# Altium PCB pcb.pcbdoc (part 2 of 2)
Units mil, origin at the board's own origin, x right, y up, seen from the top; angles counter-clockwise.
Board outline 4735 x 3735 mil, 2 copper layers (Top Layer, Bottom Layer); 22 components, 42 nets, 118 pads, 18 vias.
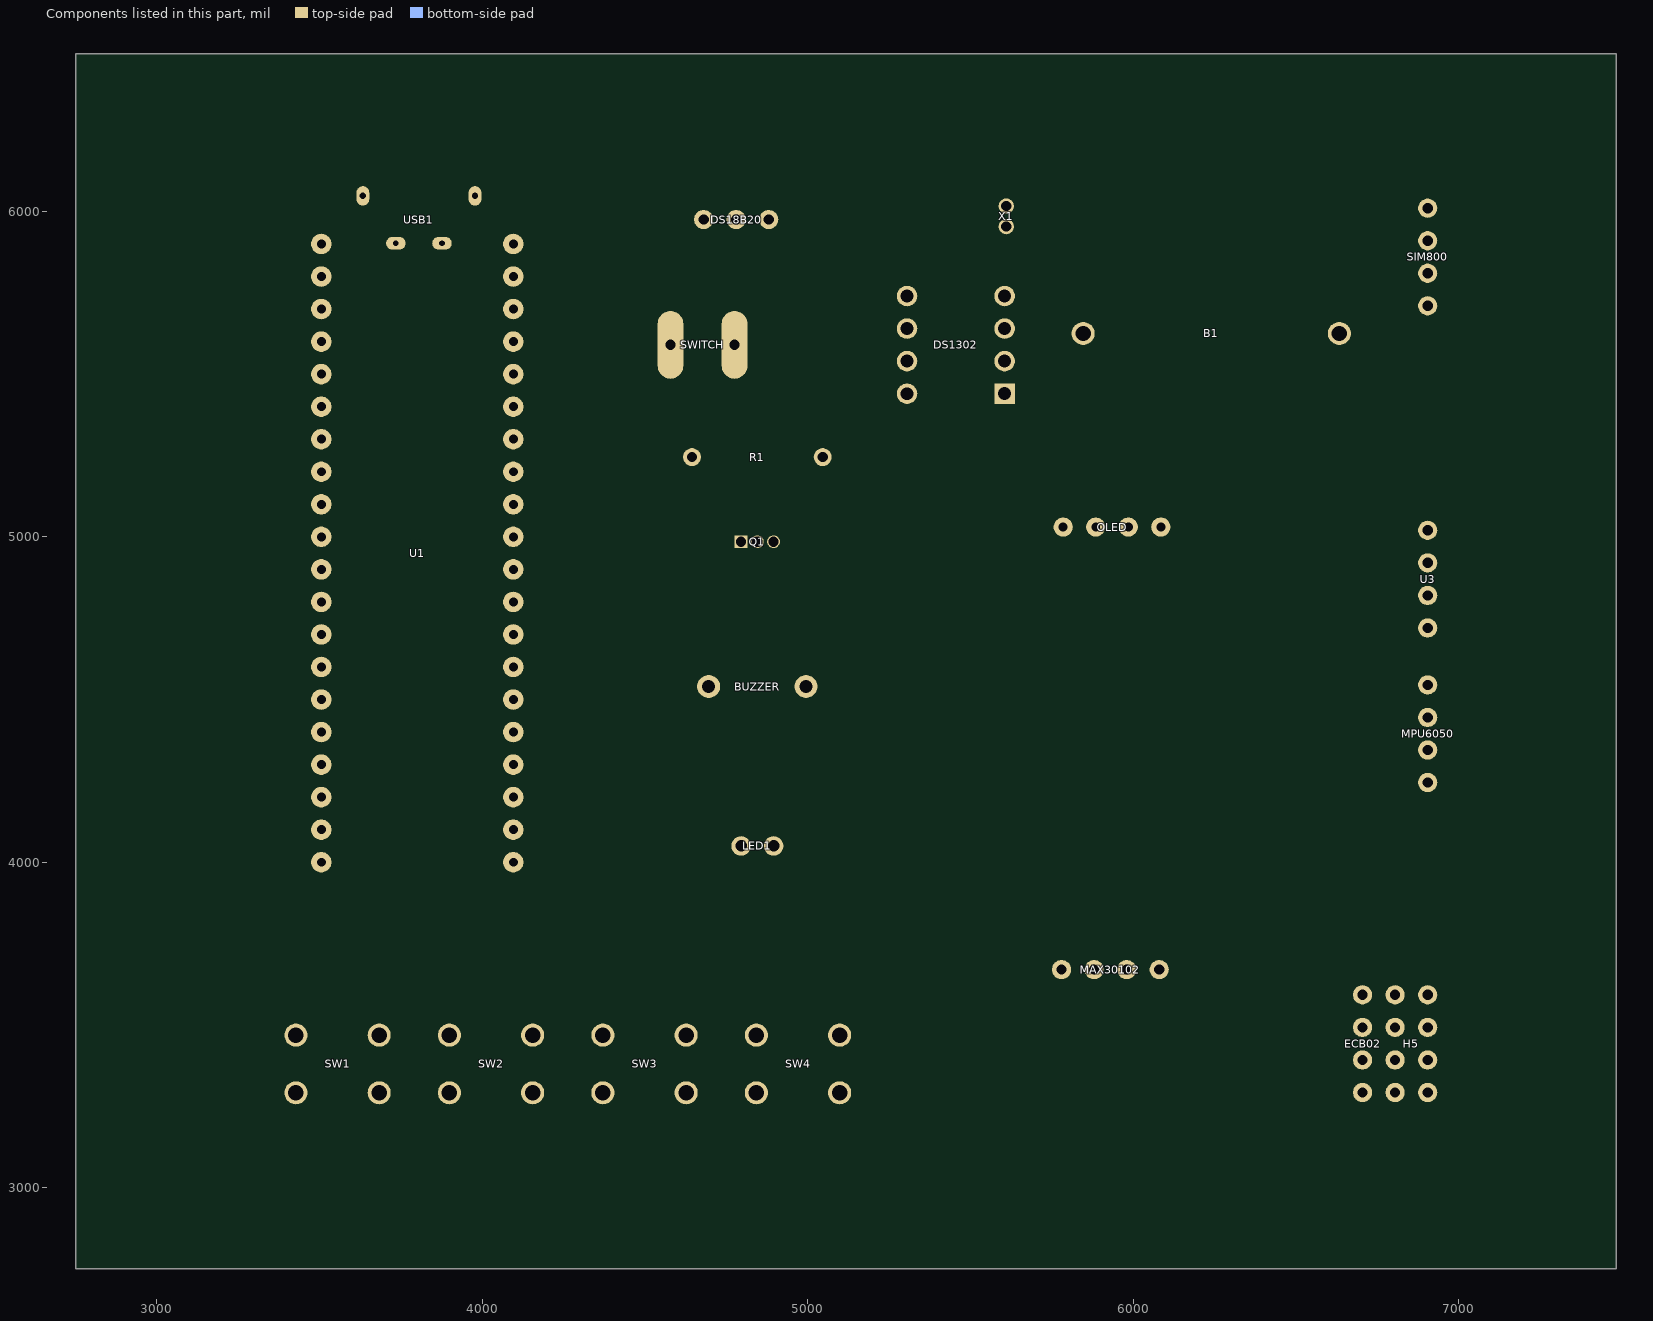
[diagram p2: the components of this part, seen from the top]

## Other copper (continued)
Bottom Layer:
  region net 5VOUT: 4902.95,5619.53 4902.95,5560.47 4886.43,5560.77 4870.43,5561.16 4862.78,5561.18 4855.46,5560.94 4848.53,5560.37 4842.05,5559.37 4839,5558.68 4836.09,5557.84 4833.33,5556.86 4830.72,5555.71 4828.27,5554.39 4825.99,5552.88 4823.9,5551.18 4821.98,5549.26 4820.26,5547.12 4818.75,5544.76 4817.44,5542.14 4816.36,5539.28 4815.5,5536.15 4814.88,5532.74 4814.5,5529.04 4814.37,5525.04 4814.37,5654.96 4814.5,5650.96 4814.88,5647.26 4815.5,5643.85 4816.36,5640.72 4817.44,5637.86 4818.75,5635.24 4820.26,5632.88 4821.98,5630.74 4823.9,5628.82 4825.99,5627.12 4828.27,5625.61 4830.72,5624.29 4833.33,5623.14 4836.09,5622.16 4839,5621.32 4842.05,5620.63 4848.53,5619.63 4855.46,5619.06 4862.78,5618.82 4870.43,5618.84 4886.43,5619.23
  region net 5V: 4450.2,5560.47 4450.2,5619.53 4466.72,5619.23 4482.72,5618.84 4490.37,5618.82 4497.69,5619.06 4504.62,5619.63 4511.1,5620.63 4514.15,5621.32 4517.06,5622.16 4519.82,5623.14 4522.43,5624.29 4524.88,5625.61 4527.16,5627.12 4529.25,5628.82 4531.17,5630.74 4532.89,5632.88 4534.4,5635.24 4535.7,5637.86 4536.79,5640.72 4537.65,5643.85 4538.27,5647.26 4538.65,5650.96 4538.78,5654.96 4538.78,5525.04 4538.65,5529.04 4538.27,5532.74 4537.65,5536.15 4536.79,5539.28 4535.7,5542.14 4534.4,5544.76 4532.89,5547.12 4531.17,5549.26 4529.25,5551.18 4527.16,5552.88 4524.88,5554.39 4522.43,5555.71 4519.82,5556.86 4517.06,5557.84 4514.15,5558.68 4511.1,5559.37 4504.62,5560.37 4497.69,5560.94 4490.37,5561.18 4482.72,5561.16 4466.72,5560.77
  region net PA12: 6060,4997.98 6052.93,5005.05 6054.44,5006.7 6055.6,5008.26 6056.46,5009.77 6057.04,5011.23 6057.38,5012.66 6057.53,5014.09 6057.34,5016.98 6056.08,5023.43 6055.57,5027.26 6055.47,5029.39 6055.52,5031.69 6086.64,5000.57 6084.34,5000.52 6082.21,5000.62 6078.38,5001.13 6071.93,5002.39 6069.04,5002.58 6067.61,5002.43 6066.18,5002.09 6064.72,5001.51 6063.21,5000.65 6061.65,4999.49
  region net PA11: 5973.92,4986.85 5958.9,4985.97 5960.08,4987.3 5961.1,4988.76 5961.97,4990.34 5962.69,4992.01 5963.27,4993.77 5963.7,4995.6 5964.13,4999.38 5964,5003.22 5963.34,5006.97 5962.14,5010.51 5961.35,5012.15 5960.43,5013.68 6004,5007.45 5999.23,5003.72 5995.23,5001.09 5991.75,4999.17 5988.56,4997.58 5985.42,4995.94 5982.1,4993.86 5978.34,4990.95
  region: 3422.05,3517.01 3432.05,3517.01 3432.17,3514.21 3432.53,3511.82 3433.11,3509.78 3433.89,3508.04 3434.86,3506.55 3436,3505.26 3437.3,3504.11 3438.74,3503.07 3441.98,3501.08 3445.6,3498.87 3447.51,3497.56 3449.47,3496.05 3451.46,3494.28 3453.46,3492.2 3400.64,3492.2 3402.64,3494.28 3404.63,3496.05 3406.59,3497.56 3408.5,3498.87 3412.12,3501.08 3415.36,3503.07 3416.8,3504.11 3418.1,3505.26 3419.24,3506.55 3420.21,3508.04 3420.99,3509.78 3421.57,3511.82 3421.93,3514.21
  region net PC14: 3893.72,3517.01 3903.72,3517.01 3903.84,3514.21 3904.2,3511.82 3904.78,3509.78 3905.56,3508.04 3906.53,3506.55 3907.67,3505.26 3908.97,3504.11 3910.41,3503.07 3913.65,3501.08 3917.27,3498.87 3919.18,3497.56 3921.13,3496.05 3923.12,3494.28 3925.13,3492.2 3872.31,3492.2 3874.31,3494.28 3876.3,3496.05 3878.26,3497.56 3880.17,3498.87 3883.79,3501.08 3887.03,3503.07 3888.47,3504.11 3889.76,3505.26 3890.91,3506.55 3891.88,3508.04 3892.66,3509.78 3893.24,3511.82 3893.59,3514.21
  region net PC13: 4365.38,3517.01 4375.38,3517.01 4375.51,3514.21 4375.86,3511.82 4376.44,3509.78 4377.22,3508.04 4378.19,3506.55 4379.34,3505.26 4380.63,3504.11 4382.07,3503.07 4385.31,3501.08 4388.93,3498.87 4390.84,3497.56 4392.8,3496.05 4394.79,3494.28 4396.79,3492.2 4343.97,3492.2 4345.98,3494.28 4347.97,3496.05 4349.92,3497.56 4351.83,3498.87 4355.45,3501.08 4358.69,3503.07 4360.13,3504.11 4361.43,3505.26 4362.57,3506.55 4363.54,3508.04 4364.32,3509.78 4364.9,3511.82 4365.26,3514.21
  region net PB4: 4793.62,3463.58 4793.62,3473.58 4796.42,3473.7 4798.81,3474.06 4800.85,3474.64 4802.59,3475.42 4804.08,3476.39 4805.37,3477.53 4806.52,3478.83 4807.56,3480.27 4809.55,3483.51 4811.76,3487.13 4813.07,3489.04 4814.58,3491 4816.35,3492.99 4818.43,3494.99 4818.43,3442.17 4816.35,3444.17 4814.58,3446.16 4813.07,3448.12 4811.76,3450.03 4809.55,3453.65 4807.56,3456.89 4806.52,3458.33 4805.37,3459.63 4804.08,3460.77 4802.59,3461.74 4800.85,3462.52 4798.81,3463.1 4796.42,3463.46
  region net PB14: 3548.04,5705 3548.04,5695 3545.63,5694.89 3543.54,5694.59 3541.75,5694.09 3540.21,5693.41 3538.87,5692.58 3537.7,5691.59 3536.66,5690.47 3535.7,5689.23 3531.85,5683.31 3529.34,5679.97 3527.79,5678.25 3526,5676.52 3526,5723.48 3527.79,5721.75 3529.34,5720.03 3531.85,5716.69 3535.7,5710.77 3536.66,5709.53 3537.7,5708.41 3538.87,5707.42 3540.21,5706.59 3541.75,5705.91 3543.54,5705.41 3545.63,5705.11
  region net PB15: 3467.07,5597.93 3467.07,5607.93 3468.43,5608.08 3469.76,5608.5 3471.06,5609.16 3472.33,5610.04 3474.81,5612.29 3477.21,5615 3481.82,5620.77 3484.06,5623.33 3486.28,5625.33 3481.91,5578.58 3480.26,5580.8 3478.63,5583.64 3475.28,5590.07 3473.48,5593.08 3471.54,5595.59 3470.51,5596.56 3469.42,5597.3 3468.28,5597.76
  region net PA9: 3548.04,5405 3548.04,5395 3545.63,5394.89 3543.54,5394.59 3541.75,5394.09 3540.21,5393.41 3538.87,5392.58 3537.7,5391.59 3536.66,5390.47 3535.7,5389.23 3531.85,5383.31 3529.34,5379.97 3527.79,5378.25 3526,5376.52 3526,5423.48 3527.79,5421.75 3529.34,5420.03 3531.85,5416.69 3535.7,5410.77 3536.66,5409.53 3537.7,5408.41 3538.87,5407.42 3540.21,5406.59 3541.75,5405.91 3543.54,5405.41 3545.63,5405.11
  region net PB4: 3548.04,4805 3548.04,4795 3545.63,4794.89 3543.54,4794.59 3541.75,4794.09 3540.21,4793.41 3538.87,4792.58 3537.7,4791.59 3536.66,4790.47 3535.7,4789.23 3531.85,4783.31 3529.34,4779.97 3527.79,4778.25 3526,4776.52 3526,4823.48 3527.79,4821.75 3529.34,4820.03 3531.85,4816.69 3535.7,4810.77 3536.66,4809.53 3537.7,4808.41 3538.87,4807.42 3540.21,4806.59 3541.75,4805.91 3543.54,4805.41 3545.63,4805.11
  region net 5VOUT: 3467.2,4170.47 3467.2,4229.53 3474.21,4229.61 3480.94,4229.84 3492.81,4230.51 3505,4231.5 3505,4168.5 3492.81,4169.49 3480.94,4170.16 3474.21,4170.39
  region net PA2: 4138.04,4605 4138.04,4595 4135.63,4594.89 4133.54,4594.59 4131.75,4594.09 4130.21,4593.41 4128.87,4592.58 4127.7,4591.59 4126.66,4590.47 4125.7,4589.23 4121.85,4583.31 4119.34,4579.97 4117.79,4578.25 4116,4576.52 4116,4623.48 4117.79,4621.75 4119.34,4620.03 4121.85,4616.69 4125.7,4610.77 4126.66,4609.53 4127.7,4608.41 4128.87,4607.42 4130.21,4606.59 4131.75,4605.91 4133.54,4605.41 4135.63,4605.11
  region net PA3: 4121.9,4733.97 4128.97,4726.9 4127.34,4725.12 4126.08,4723.42 4125.17,4721.8 4124.55,4720.24 4124.2,4718.7 4124.07,4717.18 4124.13,4715.65 4124.32,4714.09 4125.79,4707.18 4126.38,4703.05 4126.49,4700.74 4126.45,4698.25 4093.25,4731.45 4095.74,4731.49 4098.05,4731.38 4102.18,4730.79 4109.09,4729.32 4110.65,4729.13 4112.18,4729.07 4113.7,4729.2 4115.24,4729.55 4116.8,4730.17 4118.42,4731.08 4120.12,4732.34
  region net PA4: 4051.96,4795 4051.96,4805 4054.37,4805.11 4056.46,4805.41 4058.25,4805.91 4059.79,4806.59 4061.13,4807.42 4062.3,4808.41 4063.34,4809.53 4064.3,4810.77 4068.15,4816.69 4070.66,4820.03 4072.21,4821.75 4074,4823.48 4074,4776.52 4072.21,4778.25 4070.66,4779.97 4068.15,4783.31 4064.3,4789.23 4063.34,4790.47 4062.3,4791.59 4061.13,4792.58 4059.79,4793.41 4058.25,4794.09 4056.46,4794.59 4054.37,4794.89
  region net $1N1852: 5352.6,5434.15 5310.85,5392.4 5305.83,5397.29 5300.91,5401.89 5292.04,5409.81 5282.73,5417.73 5327.27,5462.27 5335.19,5452.96 5343.11,5444.09 5347.71,5439.17
  region net $1N1852: 6664.53,5581.18 6605.47,5581.18 6605.4,5584.97 6605.2,5588.31 6604.46,5593.89 6603.41,5598.42 6602.18,5602.44 6600.91,5606.46 6599.74,5610.99 6598.82,5616.57 6598.5,5619.9 6598.29,5623.7 6669.1,5626.31 6669.15,5618.79 6668.74,5612.88 6668.02,5608.05 6667.13,5603.75 6666.2,5599.45 6665.36,5594.61 6664.76,5588.7
  region net PA5: 4754,4045 4754,4055 4756.27,4055.1 4758.24,4055.39 4759.94,4055.86 4761.41,4056.49 4762.69,4057.28 4763.81,4058.2 4765.74,4060.43 4769.46,4065.99 4771.85,4069.12 4773.31,4070.74 4775,4072.36 4775,4027.64 4773.31,4029.26 4771.85,4030.88 4769.46,4034.01 4765.74,4039.57 4763.81,4041.8 4762.69,4042.72 4761.41,4043.51 4759.94,4044.14 4758.24,4044.61 4756.27,4044.9
  region net PB11: 6780,3560.37 6772.93,3567.44 6774.44,3569.09 6775.6,3570.65 6776.46,3572.16 6777.04,3573.62 6777.38,3575.05 6777.53,3576.48 6777.34,3579.37 6776.08,3585.82 6775.57,3589.65 6775.47,3591.78 6775.52,3594.08 6806.64,3562.96 6804.34,3562.91 6802.21,3563.01 6798.38,3563.52 6791.93,3564.78 6789.04,3564.97 6787.61,3564.82 6786.18,3564.48 6784.72,3563.9 6783.21,3563.04 6781.65,3561.88
  region net PB10: 6872.93,3317.44 6880,3324.51 6881.65,3323 6883.21,3321.84 6884.72,3320.98 6886.18,3320.4 6887.61,3320.06 6889.04,3319.92 6891.93,3320.1 6898.38,3321.36 6902.21,3321.87 6904.34,3321.97 6906.64,3321.92 6875.52,3290.8 6875.47,3293.1 6875.57,3295.23 6876.08,3299.07 6877.34,3305.51 6877.53,3308.4 6877.38,3309.83 6877.04,3311.26 6876.46,3312.72 6875.6,3314.23 6874.44,3315.79
  region net PB11: 6664.63,3487.46 6664.66,3497.46 6666.89,3497.56 6668.82,3497.84 6670.49,3498.3 6671.93,3498.92 6673.19,3499.69 6674.3,3500.6 6676.21,3502.77 6679.88,3508.22 6682.23,3511.29 6683.67,3512.87 6685.33,3514.46 6685.3,3470.44 6683.65,3472.04 6682.21,3473.62 6679.86,3476.69 6676.19,3482.14 6674.27,3484.32 6673.16,3485.22 6671.91,3486 6670.46,3486.62 6668.79,3487.08 6666.86,3487.36
  region net PB11: 6730,3524.51 6737.07,3517.44 6735.56,3515.79 6734.4,3514.23 6733.54,3512.72 6732.96,3511.26 6732.62,3509.83 6732.47,3508.4 6732.66,3505.51 6733.92,3499.07 6734.43,3495.23 6734.53,3493.1 6734.48,3490.8 6703.36,3521.92 6705.66,3521.97 6707.79,3521.87 6711.62,3521.36 6718.07,3520.1 6720.96,3519.92 6722.39,3520.06 6723.82,3520.4 6725.28,3520.98 6726.79,3521.84 6728.35,3523
  region net PB10: 6664.64,3387.45 6664.65,3397.45 6666.88,3397.55 6668.81,3397.83 6670.48,3398.29 6671.92,3398.91 6673.18,3399.68 6674.29,3400.59 6676.2,3402.76 6679.87,3408.21 6682.23,3411.28 6683.66,3412.86 6685.32,3414.45 6685.31,3370.44 6683.65,3372.03 6682.22,3373.61 6679.86,3376.68 6676.19,3382.13 6674.28,3384.31 6673.17,3385.22 6671.91,3385.99 6670.47,3386.61 6668.8,3387.07 6666.87,3387.35
  region net PB10: 6737.07,3367.44 6730,3360.37 6728.35,3361.88 6726.79,3363.04 6725.28,3363.9 6723.82,3364.48 6722.39,3364.82 6720.96,3364.97 6718.07,3364.78 6711.62,3363.52 6707.79,3363.01 6705.66,3362.91 6703.36,3362.96 6734.48,3394.08 6734.53,3391.78 6734.43,3389.65 6733.92,3385.82 6732.66,3379.37 6732.47,3376.48 6732.62,3375.05 6732.96,3373.62 6733.54,3372.16 6734.4,3370.65 6735.56,3369.09
  region: 3788.59,3725 3788.59,3735 3789.71,3735.09 3790.84,3735.34 3793.07,3736.23 3795.17,3737.5 3796.99,3738.95 3796.99,3721.05 3795.17,3722.5 3793.07,3723.77 3790.84,3724.66 3789.71,3724.91
  region net PC14: 3903.72,3713.59 3893.72,3713.59 3893.63,3714.71 3893.38,3715.84 3892.48,3718.07 3891.22,3720.17 3889.77,3721.99 3907.67,3721.99 3906.22,3720.17 3904.95,3718.07 3904.06,3715.84 3903.81,3714.71
  region net PC13: 4375.38,3713.59 4365.38,3713.59 4365.29,3714.71 4365.04,3715.84 4364.15,3718.07 4362.88,3720.17 4361.43,3721.99 4379.33,3721.99 4377.88,3720.17 4376.62,3718.07 4375.72,3715.84 4375.47,3714.71
  region net PA5: 4471.41,4055 4471.41,4045 4470.29,4044.91 4469.16,4044.66 4466.93,4043.77 4464.83,4042.5 4463.01,4041.05 4463.01,4058.95 4464.83,4057.5 4466.93,4056.23 4469.16,4055.34 4470.29,4055.09
  region net PA4: 3980,5483.59 3970,5483.59 3969.91,5484.71 3969.66,5485.84 3968.77,5488.07 3967.5,5490.17 3966.05,5491.99 3983.95,5491.99 3982.5,5490.17 3981.23,5488.07 3980.34,5485.84 3980.09,5484.71
  region net PA2: 4285,4713.59 4275,4713.59 4274.91,4714.71 4274.66,4715.84 4273.77,4718.07 4272.5,4720.17 4271.05,4721.99 4288.95,4721.99 4287.5,4720.17 4286.23,4718.07 4285.34,4715.84 4285.09,4714.71
  region net PA3: 4263.59,4785 4263.59,4795 4264.71,4795.09 4265.84,4795.34 4268.07,4796.23 4270.17,4797.5 4271.99,4798.95 4271.99,4781.05 4270.17,4782.5 4268.07,4783.77 4265.84,4784.66 4264.71,4784.91
  region net PA11: 4581.41,5315 4581.41,5305 4580.29,5304.91 4579.16,5304.66 4576.93,5303.77 4574.83,5302.5 4573.01,5301.05 4573.01,5318.95 4574.83,5317.5 4576.93,5316.23 4579.16,5315.34 4580.29,5315.09
  region net PA12: 4501.41,5290 4501.41,5280 4500.29,5279.91 4499.16,5279.66 4496.93,5278.77 4494.83,5277.5 4493.01,5276.05 4493.01,5293.95 4494.83,5292.5 4496.93,5291.23 4499.16,5290.34 4500.29,5290.09
  region net PB14: 4335,4620.66 4325,4620.66 4324.91,4621.78 4324.66,4622.91 4323.77,4625.15 4322.5,4627.24 4321.05,4629.07 4338.95,4629.07 4337.5,4627.24 4336.23,4625.15 4335.34,4622.91 4335.09,4621.78
  region net PB15: 4320,4701.41 4330,4701.41 4330.09,4700.29 4330.34,4699.16 4331.23,4696.93 4332.5,4694.83 4333.95,4693.01 4316.05,4693.01 4317.5,4694.83 4318.77,4696.93 4319.66,4699.16 4319.91,4700.29
  region net PB9: 5219.86,4308.07 5226.93,4315.14 5227.79,4314.41 5228.76,4313.79 5230.98,4312.84 5233.35,4312.26 5235.67,4311.99 5223.01,4299.33 5222.74,4301.65 5222.16,4304.02 5221.21,4306.24 5220.59,4307.21
  region net PB9: 3641.41,4355 3641.41,4345 3640.29,4344.91 3639.16,4344.66 3636.93,4343.77 3634.83,4342.5 3633.01,4341.05 3633.01,4358.95 3634.83,4357.5 3636.93,4356.23 3639.16,4355.34 3640.29,4355.09
  region net PB8: 5244.86,4403.07 5251.93,4410.14 5252.79,4409.41 5253.76,4408.79 5255.98,4407.84 5258.35,4407.26 5260.67,4406.99 5248.01,4394.33 5247.74,4396.65 5247.16,4399.02 5246.21,4401.24 5245.59,4402.21
  region net PB8: 3641.41,4455 3641.41,4445 3640.29,4444.91 3639.16,4444.66 3636.93,4443.77 3634.83,4442.5 3633.01,4441.05 3633.01,4458.95 3634.83,4457.5 3636.93,4456.23 3639.16,4455.34 3640.29,4455.09
  region net PB11: 4425,5483.59 4415,5483.59 4414.91,5484.71 4414.66,5485.84 4413.77,5488.07 4412.5,5490.17 4411.05,5491.99 4428.95,5491.99 4427.5,5490.17 4426.23,5488.07 4425.34,5485.84 4425.09,5484.71
  region net PB10: 4395,5383.59 4385,5383.59 4384.91,5384.71 4384.66,5385.84 4383.77,5388.07 4382.5,5390.17 4381.05,5391.99 4398.95,5391.99 4397.5,5390.17 4396.23,5388.07 4395.34,5385.84 4395.09,5384.71
  region net PA9: 3565,5558.59 3555,5558.59 3554.91,5559.71 3554.66,5560.84 3553.77,5563.07 3552.5,5565.17 3551.05,5566.99 3568.95,5566.99 3567.5,5565.17 3566.23,5563.07 3565.34,5560.84 3565.09,5559.71
  region net 5VOUT: 6905,5680.47 cw(c6905,5547.62) 7015.47,5621.42 7045,5709.67 7015.47,5798.58 cw(c6905,5872.38) 6905,5739.53
  region net 5VOUT: 6905,4690.47 cw(c6905,4557.62) 7015.47,4631.42 7045,4720 7015.47,4808.58 cw(c6905,4882.38) 6905,4749.53

## Text inside footprints (layer, text, board x,y; h text height)
BUZZER: Top Silkscreen Layer "+" at 4670,4609.5 h50